# Altium PCB iMX6 Rex_V1I1_PCB.PcbDoc (part 5 of 8)
Units mm, origin at the board's own origin, x right, y up, seen from the top; angles counter-clockwise.
Board outline 70 x 40 mm, 12 copper layers (L1, L2, L3, L4, L5 (PWR), L6 (PWR), L7 (PWR), L8 (PWR), L9, L10, L11, L12), stack 1.566 mm thick; 473 components, 409 nets, 2294 pads, 1880 vias.
Unrouted connection lines stored in the file: 7.
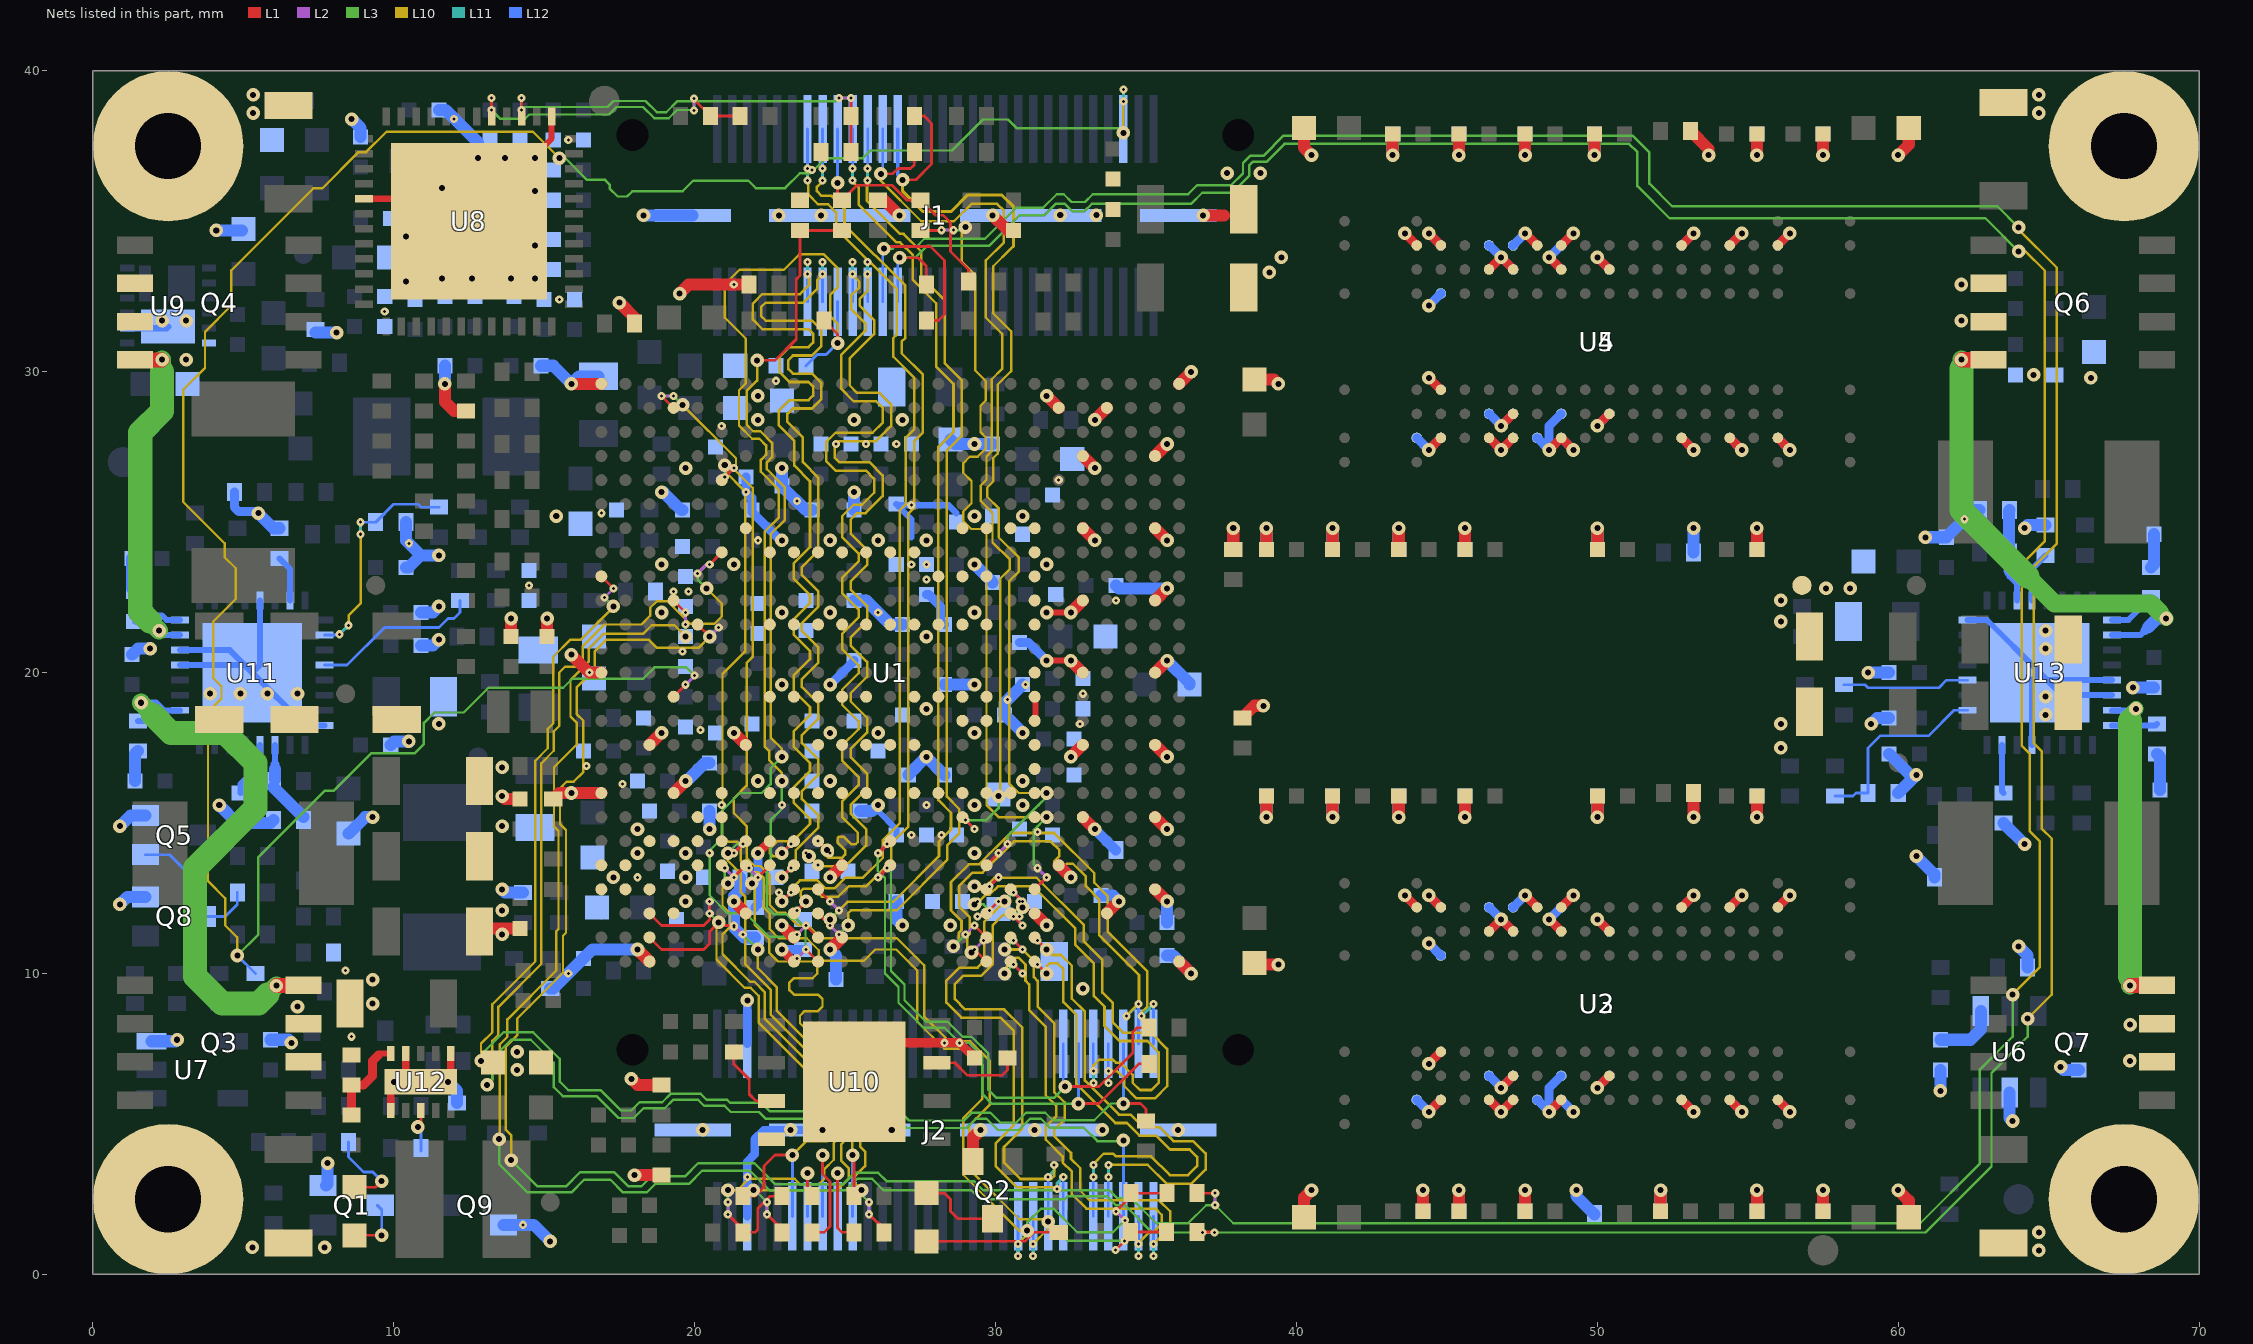
[diagram p15: the nets of this part, all layers, seen from the top]

## Via types
v1: diameter 0.45, hole 0.2, L1 to L12, tented both sides, 761 vias
v2: diameter 0.27, hole 0.1, L1 to L2, 305 vias
v3: diameter 0.27, hole 0.1, L2 to L3, 290 vias
v4: diameter 0.45, hole 0.2, L3 to L10, 196 vias
v5: diameter 0.27, hole 0.1, L11 to L12, 185 vias
v6: diameter 0.27, hole 0.1, L10 to L11, 142 vias
v7: diameter 0.45, hole 0.2, L3 to L10, tented both sides, 1 vias

## Nets (pads, with @x,y where several pads share a name; then routed paths per layer and width w, separated by ;. In a path a pad name is that pad's centre, name@x,y a point inside that pad or via, vN(x,y) a via of type N, cw(c..) or ccw(c..) an arc to the next point about the centre after c; other vN are vias at no path point) (continued)
FB1_2V5: R147.1 R150.2 U13.11 | length 3.1
  L12 w0.2: 63.7,23.3 63.7,23.2 63.95,22.95 U13.11@63.95,22.4
  L12 w0.3: 63.7,23.3 63.7,23.4
  L12 w0.4: 63.7,23.4 R147.1@63.7,24 63.675,24.025 63.675,25.375 R150.2@63.7,25.4
FB1_3V3: R123.1 R126.2 U11.11 | length 2.6
  L12 w0.2: 6.05,16.95 U11.11@6.05,17.6
  L12 w0.3: 6.05,16.8 6.05,16.95
  L12 w0.4: R123.1@6,16.2 R126.2@7,15.2 ; R123.1@6.05,16.45 6.05,16.8
FB_3V0_SNVS: R138.1 R139.2 U12.5 | length 3
  L1 w0.2: 9.5,7.3 9.55,7.35 U12.5@9.9,7.35
  L1 w0.3: R138.1@8.6,5.3 R139.2@8.6,6.3 9,6.3 9.3,6.6 9.3,7.1 9.5,7.3
GND: C1.2 C2.2 C3.2 C4.2 C5.2 C6.2 C7.2 C8.2 C9.2 C10.2 C11.2 C12.2 C13.2 C14.2 C15.2 C16.2 C17.2 C19.2 C20.2 C21.2 C22.2 C23.2 C24.2 C25.2 C26.2 C27.2 C28.2 C29.2 C30.2 C31.2 C32.2 C33.2 C34.2 C35.2 C36.2 C37.2 C38.2 C39.2 C40.2 C41.2 C42.2 C43.2 C44.2 C45.2 C46.2 C47.2 C48.2 C49.2 C50.2 C51.2 C52.2 C53.2 C54.2 C55.2 C56.2 C57.2 C58.2 C59.2 C60.2 C61.2 C62.2 C64.2 C68.2 C73.2 C74.1 C75.2 C76.2 C77.2 C78.2 C79.2 C80.2 C81.2 C82.2 C83.2 C84.2 C85.2 C86.2 C87.2 C88.2 C89.2 C90.2 C91.2 C92.2 C93.2 C94.2 C95.2 C96.2 C97.2 C98.2 C99.2 C100.2 C101.2 C102.2 C103.2 C104.2 C105.2 C106.2 C107.2 C108.2 C109.2 C110.2 C111.2 C112.2 C113.2 C114.2 C115.2 C116.2 C117.2 C118.2 C119.2 C120.2 C121.2 C122.2 C123.2 C124.2 C125.2 C126.2 C127.2 C128.2 C129.2 C130.2 C131.2 C132.2 C133.2 C134.2 C135.2 C136.2 C137.2 C138.2 C139.1 C140.2 C141.2 C142.2 C143.2 C144.2 C145.2 C146.2 C147.2 C148.2 C149.2 C150.2 C151.2 C152.2 C153.2 C154.2 C155.2 C156.2 C157.2 C158.2 C159.2 C160.2 C161.2 C162.2 C163.2 C164.2 C165.2 C166.2 C167.2 C168.2 C169.2 C170.2 C171.2 C172.2 C173.2 C174.2 C175.2 C176.2 C177.2 C178.2 C180.2 C181.2 C182.2 C183.2 C184.2 C185.2 C186.2 C187.2 C188.2 C189.2 C190.2 C191.2 C192.2 C193.2 C194.2 C195.2 C196.2 C197.2 C198.2 C199.2 C200.2 C201.2 C202.2 C203.2 C204.2 C205.2 C206.2 C207.2 C208.2 C209.2 C210.2 C213.2 C214.2 C215.2 C216.2 C217.2 C218.2 C219.2 C220.2 C221.2 C222.2 C223.2 C224.2 C225.2 C226.2 C227.2 C228.2 C229.2 C232.2 C233.2 C234.2 C235.2 C236.2 C237.2 C238.2 C239.2 C240.2 C241.2 C242.2 C243.2 C244.2 C245.2 C246.2 C247.2 C248.2 C249.2 J1.61 J1.62 J1.63 J1.64 J2.55 J2.56 J2.61 J2.62 J2.63 J2.64 MH1.1 MH2.1 MH3.1 MH4.1 Q1.2 Q2.2 Q3.2 Q3.3 Q4.2 Q4.3 Q5.2 Q6.2 Q6.3 Q7.2 Q7.3 Q8.2 Q9.2 R4.1 R5.1 R6.1 R7.1 R8.1 R9.1 R10.2 R12.1 R15.1 R16.1 R17.1 R20.1 R26.1 R30.1 R37.2 R56.1 R57.1 R58.1 R61.1 R67.1 R79.1 R84.2 R99.1 R101.1 R102.1 R124.2 R125.1 R126.1 R133.1 R136.1 R139.1 R143.1 R144.1 R148.2 R149.1 R150.1 R155.1 R158.1 TP10.1 U1.A4 U1.A5 U1.A8 U1.A13 U1.A25 U1.AA7 U1.AA10 U1.AA13 U1.AA16 U1.AA19 U1.AA22 U1.AB3 U1.AB24 U1.AD4 U1.AD7 U1.AD10 U1.AD13 U1.AD16 U1.AD19 U1.AD22 U1.AE1 U1.AE25 U1.B4 U1.B5 U1.C1 U1.C4 U1.C6 U1.C10 U1.D3 U1.D6 U1.D8 U1.E5 U1.E6 U1.E7 U1.F5 U1.F6 U1.F7 U1.F8 U1.G3 U1.G10 U1.G19 U1.H8 U1.H12 U1.H15 U1.H18 U1.J2 U1.J8 U1.J12 U1.J15 U1.J18 U1.K8 U1.K10 U1.K12 U1.K15 U1.K18 U1.L2 U1.L5 U1.L8 U1.L10 U1.L12 U1.L15 U1.L18 U1.M8 U1.M10 U1.M12 U1.M15 U1.M18 U1.N8 U1.N10 U1.N15 U1.N18 U1.P8 U1.P10 U1.P12 U1.P15 U1.P18 U1.R8 U1.R12 U1.R15 U1.R17 U1.T8 U1.T11 U1.T12 U1.T15 U1.T17 U1.T19 U1.U8 U1.U11 U1.U12 U1.U15 U1.U17 U1.U19 U1.V8 U1.V19 U1.W3 U1.W7 U1.W8 U1.W9 U1.W10 U1.W11 U1.W12 U1.W13 U1.W15 U1.W16 U1.W17 U1.W18 U1.W19 U1.Y5 U1.Y24 U2.A9 U2.B1 U2.B3 U2.B9 U2.D1 U2.D8 U2.E1 U2.E2 U2.E8 U2.F9 U2.G1 U2.G8 U2.G9 U2.J2 U2.J8 U2.M1 U2.M9 U2.P1 U2.P9 U2.T1 U2.T9 U3.A9 U3.B1 U3.B3 U3.B9 U3.D1 U3.D8 U3.E1 U3.E2 U3.E8 U3.F9 U3.G1 U3.G8 U3.G9 U3.J2 U3.J8 U3.M1 U3.M9 U3.P1 U3.P9 U3.T1 U3.T9 U4.A9 U4.B1 U4.B3 U4.B9 U4.D1 U4.D8 U4.E1 U4.E2 U4.E8 U4.F9 U4.G1 U4.G8 U4.G9 U4.J2 U4.J8 U4.M1 U4.M9 U4.P1 U4.P9 U4.T1 U4.T9 U5.A9 U5.B1 U5.B3 U5.B9 U5.D1 U5.D8 U5.E1 U5.E2 U5.E8 U5.F9 U5.G1 U5.G8 U5.G9 U5.J2 U5.J8 U5.M1 U5.M9 U5.P1 U5.P9 U5.T1 U5.T9 U6.2 U7.3 U8.13 U8.29 U8.49 U9.2 U9.12 U9.13 U10.4 U10.9 U11.8 U11.21 U11.22 U11.29 U11.33 U12.1 U12.4 U12.6 U12.11 U13.8 U13.21 U13.22 U13.29 U13.33 | length 250
  L1 w0.2: U8.29@9.01,35.75 U8.49@10.2,35.75 ; U8.49@14.65,37.15 15.25,37.75 U8.13@15.25,38.49 ; U1.W11@31.3,18.4 31.325,18.425 31.325,19.175 U1.W12@31.3,19.2 ; v1(31.7,20.4) v1(32.5,20.4) ; v1(31.7,22) v1(32.5,22)
  L1 w0.25: U12.6@9.9,5.35 9.9,6.3 v1(10,6.4) ; U12.11@10.4,6.2 U12.4@10.4,7.25 ; U12.11@11.9,6.4 U12.1@11.9,7.25
  L1 w0.3: U10.9@25.3,6.4 26.6,7.7 v2(28.8,7.7) C203.2@29.3,7.2 ; v1(43.6,12.6) U2.A9@44,12.2 ; v1(43.6,34.6) U4.A9@44,34.2 ; v1(44.4,5.4) U2.B1@44.8,5.8 ; v1(44.4,7) U2.B3@44.8,7.4 ; v1(44.4,12.6) U2.B9@44.8,12.2 ; v1(44.4,27.4) U4.B1@44.8,27.8 ; v1(44.4,29.8) U4.B3@44.8,29.4 ; v1(44.4,34.6) U4.B9@44.8,34.2 ; U2.D1@46.4,5.8 v1(46.8,5.4) U2.E1@47.2,5.8 ; U2.D8@46.4,11.4 v1(46.8,11.8) U2.E8@47.2,11.4 ; U4.D1@46.4,27.8 v1(46.8,27.4) U4.E1@47.2,27.8 ; U4.D8@46.4,33.4 v1(46.8,33.8) U4.E8@47.2,33.4 ; v1(46.8,6.2) U2.E2@47.2,6.6 ; v1(46.8,28.2) U4.E2@47.2,28.6 ; v1(47.6,12.6) U2.F9@48,12.2 ; v1(47.6,34.6) U4.F9@48,34.2 ; v1(48.4,5.4) U2.G1@48.8,5.8 ; v1(48.4,11.8) U2.G8@48.8,11.4 ; v1(48.4,27.4) U4.G1@48.8,27.8 ; v1(48.4,33.8) U4.G8@48.8,33.4 ; U2.G9@48.8,12.2 v1(49.2,12.6) ; U4.G1@48.8,27.8 v1(49.2,27.4) ; U4.G9@48.8,34.2 v1(49.2,34.6) ; v1(50,6.2) U2.J2@50.4,6.6 ; v1(50,11.8) U2.J8@50.4,11.4 ; v1(50,28.2) U4.J2@50.4,28.6 ; v1(50,33.8) U4.J8@50.4,33.4 ; U2.M1@52.8,5.8 v1(53.2,5.4) ; U2.M9@52.8,12.2 v1(53.2,12.6) ; U4.M1@52.8,27.8 v1(53.2,27.4) ; U4.M9@52.8,34.2 v1(53.2,34.6) ; U2.P1@54.4,5.8 v1(54.8,5.4) ; U2.P9@54.4,12.2 v1(54.8,12.6) ; U4.P1@54.4,27.8 v1(54.8,27.4) ; U4.P9@54.4,34.2 v1(54.8,34.6) ; U2.T1@56,5.8 v1(56.4,5.4) ; U2.T9@56,12.2 v1(56.4,12.6) ; U4.T1@56,27.8 v1(56.4,27.4) ; U4.T9@56,34.2 v1(56.4,34.6)
  L1 w0.4: v1(11.7,29.6) 11.7,29 12,28.7 R99.1@12.4,28.7 ; C215.2@13.2,11.5 C84.2@14.2,11.5 ; v1(13.6,15.9) 13.7,15.8 C83.2@14.2,15.8 ; C86.2@13.9,21.2 v1(13.9,21.8) ; C85.2@15.1,21.2 v1(15.1,21.8) ; R37.2@15.3,15.8 15.5,16 v1(15.9,16) U1.A8@16.9,16 ; v1(15.9,20.6) v2(16.5,20) U1.A13@16.9,20 ; v1@15.9,29.6 U1.A25@16.9,29.6 ; v1(17.5,32.3) 18,31.8 R84.2@18,31.6 ; v1(17.9,6.5) 18.1,6.3 R16.1@18.9,6.3 ; v1(18,3.3) R17.1@18.9,3.3 ; v1(18.1,10.8) U1.C1@18.5,10.4 ; U1.C10@18.5,17.6 v1(18.9,18) ; U1.D8@19.3,16 v1(19.7,16.4) ; v1(19.5,32.6) 19.8,32.9 v2(21.3,32.9) R143.1@21.8,32.9 ; v1(21.3,12.4) U1.G3@21.7,12 ; v1(21.3,18) U1.G10@21.7,17.6 ; v1(22.9,11.6) U1.J2@23.3,11.2 ; v1(24.5,10.8) U1.L2@24.9,11.2 ; v1(24.5,13.2) U1.L5@24.9,13.6 ; R144.1@26.1,35.7 26.3,35.7 v1(26.8,35.2) ; Q2.2@29.25,3.75 29.25,4.55 v1(29.5,4.8) ; v1(29.9,35.2) 30.4,34.7 C242.2@30.6,34.7 ; U1.W3@31.3,12 v1(31.7,11.6) ; v1(31.7,29.2) U1.Y24@32.1,28.8 ; U1.Y5@32.1,13.6 v1(32.5,13.2) ; v1(32.5,17.2) U1.AA10@32.9,17.6 ; v1(32.5,20.4) U1.AA13@32.9,20 ; v1(32.5,22) U1.AA16@32.9,22.4 ; U1.AA7@32.9,15.2 v1(33.3,14.8) ; U1.AA19@32.9,24.8 v1(33.3,24.4) ; U1.AA22@32.9,27.2 v1(33.3,26.8) ; v1(33.3,28.4) U1.AB24@33.7,28.8 ; U1.AB3@33.7,12 v1(34.1,12.4) ; U1.AD4@35.3,12.8 v1(35.7,12.4) ; U1.AD7@35.3,15.2 v1(35.7,14.8) ; U1.AD10@35.3,17.6 v1(35.7,17.2) ; U1.AD13@35.3,20 v1(35.7,20.4) ; U1.AD16@35.3,22.4 v1(35.7,22.8) ; U1.AD19@35.3,24.8 v1(35.7,24.4) ; U1.AD22@35.3,27.2 v1(35.7,27.6) ; U1.AE1@36.1,10.4 v1(36.5,10) ; U1.AE25@36.1,29.6 v1(36.5,30) ; v1(36.9,35.2) 37.6,35.2 ; R10.2@37.9,24.1 v1(37.9,24.8) ; R6.1@38.2,18.5 38.6,18.9 v1@38.8,18.9 ; C12.2@38.6,10.35 38.65,10.3 v1(39.4,10.3) ; C17.2@38.6,29.75 39.25,29.75 v1(39.4,29.6) ; v1(39,15.2) C26.2@39,15.9 ; C39.2@39,24.1 v1(39,24.8) ; C14.2@40.25,1.9 40.25,2.55 v1(40.5,2.8) ; C15.2@40.25,38.1 40.25,37.45 v1(40.5,37.2) ; v1(41.2,15.2) C24.2@41.2,15.9 ; C40.2@41.2,24.1 v1(41.2,24.8) ; v1(43.2,37.2) C36.2@43.2,37.9 ; v1(43.4,15.2) C25.2@43.4,15.9 ; C31.2@43.4,24.1 v1(43.4,24.8) ; C27.2@44.2,2.1 v1(44.2,2.8) ; C28.2@45.4,2.1 v1(45.4,2.8) ; v1(45.4,37.2) C37.2@45.4,37.9 ; v1(45.6,15.2) C23.2@45.6,15.9 ; C33.2@45.6,24.1 v1(45.6,24.8) ; C29.2@47.6,2.1 v1(47.6,2.8) ; v1(47.6,37.2) C34.2@47.6,37.9 ; v1(49.9,37.2) C8.2@49.9,37.9 ; v1(50,15.2) C3.2@50,15.9 ; C9.2@50,24.1 v1(50,24.8) ; C4.2@52.1,2.1 v1(52.1,2.8) ; R8.1@53.1,38 53.7,37.4 v1(53.7,37.2) ; v1(53.2,15.2) R4.1@53.2,16 ; C30.2@55.3,2.1 v1(55.3,2.8) ; v1(55.3,15.2) C22.2@55.3,15.9 ; C32.2@55.3,24.1 v1(55.3,24.8) ; v1(55.3,37.2) C38.2@55.3,37.9 ; C21.2@57.5,2.1 v1(57.5,2.8) ; v1(57.5,37.2) C35.2@57.5,37.9 ; v1(60,2.8) 60.35,2.45 C13.2@60.35,1.9 ; v1(60,37.2) 60.35,37.55 C16.2@60.35,38.1
  L12 w0.2: U11.21@2.9,20.25 U11.33@5.05,20.25 ; U11.22@2.9,20.75 4.55,20.75 U11.33@5.05,20.25 ; U11.29@5.55,22.4 5.55,20.25 U11.33@5.3,20 ; U11.8@7.7,18.25 7.05,18.25 U11.33@5.3,20 ; v1(26.1,15.6) 26.1,15.401 26.7,14.801 C107.2@26.7,14.6 ; U13.8@62.3,21.75 62.95,21.75 U13.33@64.7,20 ; U13.29@64.45,17.6 64.45,19.75 U13.33@64.7,20 ; U13.22@67.1,19.25 65.45,19.25 U13.33@64.95,19.75 ; U13.21@67.1,19.75 U13.33@64.95,19.75 ; U11.33@5.05,20.25 U11.33@5.3,20 ; U13.33@64.7,20 U13.33@64.95,19.75
  L12 w0.22: U9.2@1.14,31.45 2.448,31.45 U9.13@2.5,31.501 ; C130.2@26.7,25.6 C130.2@26.735,25.565 ; 27.2,24.5 27.2,25.1 C130.2@26.735,25.565 ; 28.7,25.3 28.435,25.565 C130.2@26.735,25.565
  L12 w0.28: J2.55@21.75,1.93 21.75,3.75 21.994,3.994 21.994,4.494 22.3,4.8 J2.63@24.825,4.8 ; J2.56@21.75,7.67 v1(21.75,9.108)
  L12 w0.3: R136.1@4.7,26 4.7,25.5 4.85,25.35 5.45,25.35 v1(5.5,25.3) ; C125.2@21.7,26.5 v5(21.7,26) 21.9,25.8 C122.2@21.9,25.4 21.9,25.346 22.846,24.4 v1(22.9,24.4) ; v1(24.5,19.6) C94.2@25.3,20.4 ; C113.2@27.7,22.6 27.772,22.6 28.175,22.197 28.175,21.725 C97.2@28.3,21.6 ; C117.2@30.8,21 31.1,21 v1(31.7,20.4) ; U3.A9@44,5.8 v1(44.4,5.4) U3.B9@44.8,5.8 ; U5.A9@44,27.8 v1(44.4,27.4) U5.B9@44.8,27.8 ; v1(44.4,11) U3.B3@44.8,10.6 ; v1(44.4,12.6) U3.B1@44.8,12.2 ; v1(44.4,32.2) U5.B3@44.8,32.6 ; v1(44.4,34.6) U5.B1@44.8,34.2 ; U3.D8@46.4,6.6 v1(46.8,6.2) U3.E8@47.2,6.6 ; U3.D1@46.4,12.2 U3.E2@47.2,11.4 ; U5.D8@46.4,28.6 v1(46.8,28.2) U5.E8@47.2,28.6 ; U5.D1@46.4,34.2 v1(46.8,33.8) U5.E2@47.2,33.4 ; U3.E1@47.2,12.2 v1(47.6,12.6) ; U5.E1@47.2,34.2 v1(47.6,34.6) ; U3.F9@48,5.8 v1(48.4,5.4) 48.4,6.2 U3.G8@48.8,6.6 ; U5.F9@48,27.8 v1(48.4,27.4) 48.4,28.2 U5.G8@48.8,28.6 ; v1(48.4,11.8) U3.G1@48.8,12.2 ; v1(48.4,33.8) U5.G1@48.8,34.2 ; U3.G9@48.8,5.8 v1(49.2,5.4) ; U5.G9@48.8,27.8 v1(49.2,27.4) ; v1(50,6.2) U3.J8@50.4,6.6 ; v1(50,11.8) U3.J2@50.4,11.4 ; v1(50,28.2) U5.J8@50.4,28.6 ; v1(50,33.8) U5.J2@50.4,33.4 ; U3.M9@52.8,5.8 v1(53.2,5.4) ; U3.M1@52.8,12.2 v1(53.2,12.6) ; U5.M9@52.8,27.8 v1(53.2,27.4) ; U5.M1@52.8,34.2 v1(53.2,34.6) ; U3.P9@54.4,5.8 v1(54.8,5.4) ; U3.P1@54.4,12.2 v1(54.8,12.6) ; U5.P9@54.4,27.8 v1(54.8,27.4) ; U5.P1@54.4,34.2 v1(54.8,34.6) ; U3.T9@56,5.8 v1(56.4,5.4) ; U3.T1@56,12.2 v1(56.4,12.6) ; U5.T9@56,27.8 v1(56.4,27.4) ; U5.T1@56,34.2 v1(56.4,34.6)
  L12 w0.35: v1(33.3,14.8) R7.1@34,14.1
  L12 w0.4: v1(0.9,12.3) 1.15,12.55 Q8.2@1.75,12.55 ; v1(0.9,14.9) 1.25,15.25 Q5.2@1.75,15.25 ; C206.2@1.3,20.6 1.5,20.8 v1(1.9,20.8) ; U7.3@1.95,7.75 2.75,7.75 v1(2.8,7.8) ; v1(4.1,34.7) C178.2@4.95,34.7 ; v1(4.2,15.6) R125.1@4.8,15 ; R125.1@4.9,15 5.9,15 R126.1@6,15.1 ; v1(5.5,25.3) 6,24.8 R124.2@6.2,24.8 ; C89.2@5.9,7.8 6.5,7.8 v1(6.6,7.7) ; R101.1@7.4,31.3 v1(8.1,31.3) ; Q1.2@7.75,2.95 7.8,3 v1(7.8,3.7) ; C204.2@8.5,14.65 9.05,15.2 v1(9.3,15.2) ; v1(8.6,38.4) 8.9,38.1 C184.2@8.9,37.8 ; C205.2@9.9,17.6 10.014,17.714 v1(10.5,17.714) ; C219.2@10.4,23.5 10.5,23.5 10.9,23.9 ; R133.1@10.4,25 10.4,24.4 10.9,23.9 ; C218.2@10.9,20.9 11.3,20.9 v1(11.5,21.1) ; C207.2@10.9,22 11.3,22 v1(11.5,22.2) ; v1(11.5,23.9) 10.9,23.9 ; C249.2@11.5,38.7 11.727,38.7 12.8,37.627 v1(12.8,37.1) ; v1(11.6,36.1) C186.2@12.3,35.4 ; v1(11.7,29.6) C176.2@11.7,30.2 ; v1(11.8,6.4) 12.1,6.1 R58.1@12.1,5.7 ; C186.2@12.35,35.4 C186.2@12.45,35.4 ; v1(13.6,12.8) 13.7,12.7 R79.1@14.3,12.7 ; Q9.2@13.65,1.65 14.65,1.65 v1(15.2,1.1) ; C175.2@14.9,30.2 15.3,30.2 v1(15.9,29.6) 16.15,29.85 C148.2@16.8,29.85 ; R15.1@15.2,9.5 15.3,9.5 C244.2@16.3,10.5 16.6,10.8 v1(18.1,10.8) ; v1(18.3,35.2) J1.64@19.935,35.2 ; v1(18.9,26) 18.958,26 19.558,25.4 C152.2@19.6,25.4 ; v1(19.7,16.4) 19.735,16.4 20.335,17 C139.1@20.5,17 ; v1(20.5,14.8) C143.2@20.5,15.4 ; C61.2@21.5,13.2 21.5,12.774 21.3,12.574 v1(21.3,12.4) v5(21.3,11.542) 21.642,11.2 R61.1@22,11.2 ; v1(22.9,26.8) C131.2@22.9,26.2 23.7,25.4 C134.2@23.9,25.4 ; v1(24.5,10.8) 24.7,10.6 C1.2@24.7,9.8 ; C124.2@25.3,22.4 25.7,22.4 26.5,21.6 C95.2@26.9,21.6 ; C133.2@25.3,25.4 v1(25.3,26) ; C90.2@25.5,15.4 25.9,15.4 v1(26.1,15.6) ; C76.2@26.7,12.4 26.7,11.8 v1(26.9,11.6) ; C116.2@27.1,16.6 v1(27.7,17.2) C115.2@28.3,16.6 ; C105.2@28.3,19.6 v1(29.3,19.6) ; C129.2@28.5,27.75 28.65,27.6 v1(29.3,27.6) C160.2@29.9,27.6 ; v1(29.3,23.6) C114.2@29.9,23 ; v1(30.9,18) C102.2@30.3,18.6 30.3,19 C112.2@30.9,19.6 ; C243.2@33.5,12.6 33.9,12.6 v1(34.1,12.4) ; C171.2@34,22.9 34.1,22.8 v1(35.7,22.8) ; C245.2@35.7,10.6 35.9,10.6 v1(36.5,10) ; C7.2@35.7,11.7 v1(35.7,12.4) ; v1(35.7,20.4) 36.45,19.65 C172.2@36.45,19.6 ; v1(39,15.2) C46.2@39,15.9 ; C60.2@39,24.1 v1(39,24.8) ; v1(41.2,15.2) C43.2@41.2,15.9 ; C51.2@41.2,24.1 v1(41.2,24.8) ; v1(43.2,37.2) C57.2@43.2,37.9 ; v1(43.4,15.2) C45.2@43.4,15.9 ; C53.2@43.4,24.1 v1(43.4,24.8) ; C47.2@44.2,2.1 v1(44.2,2.8) ; C49.2@45.4,2.1 v1(45.4,2.8) ; v1(45.4,37.2) C56.2@45.4,37.9 ; v1(45.6,15.2) C44.2@45.6,15.9 ; C52.2@45.6,24.1 v1(45.6,24.8) ; C48.2@47.6,2.1 v1(47.6,2.8) ; v1(47.6,37.2) C59.2@47.6,37.9 ; v1(49.3,2.8) 49.3,2.6 R5.1@49.9,2 ; v1(49.9,37.2) C10.2@49.9,37.9 ; v1(50,15.2) C5.2@50,15.9 ; C11.2@50,24.1 v1(50,24.8) ; C6.2@52.1,2.1 v1(52.1,2.8) ; R9.1@53.2,24 v1(53.2,24.8) ; C50.2@55.3,2.1 v1(55.3,2.8) ; v1(55.3,15.2) C42.2@55.3,15.9 ; C54.2@55.3,24.1 v1(55.3,24.8) ; v1(55.3,37.2) C58.2@55.3,37.9 ; C41.2@57.5,2.1 v1(57.5,2.8) ; v1(57.5,37.2) C55.2@57.5,37.9 ; v1(59,20) C237.2@59.7,20 ; v1(59.1,18.3) 59.3,18.5 C226.2@59.7,18.5 ; C238.2@59.7,17.3 60.4,16.6 v1(60.6,16.6) R155.1@60,16 ; v1(60.6,13.9) 61.2,13.3 R158.1@61.2,13.2 ; v1(60.9,24.5) C224.2@61.6,24.5 62.5,25.4 R150.1@62.7,25.4 ; v1(61.4,6.1) C88.2@61.4,6.8 ; R148.2@63.5,15 v1(64.2,14.3) ; U6.2@63.7,6.05 63.7,5.2 v1(63.8,5.1) ; v1(64,10.9) 64.3,10.6 R67.1@64.3,10.2 ; v1(64.2,24.8) 64.3,24.9 R149.1@64.9,24.9 ; v1(65.4,6.9) 65.5,6.8 C87.2@66,6.8 ; v1(67.8,19.5) C225.2@68.5,19.5
  other v1: 64.675,0.8 5.3,0.9 7.7,0.9 64.675,1.4 20.263,4.805 23.187,4.805 24.25,4.805 26.55,4.805 31.3,4.8 33.55,4.805 36.065,4.8 14.1,6.8 67.7,7.1 14.1,7.4 67.705,8.3 6.8,8.9 9.3,9 32.9,9.5 9.3,9.8 13.6,11.3 28.5,11.6 13.6,12.1 19.7,12.4 17.3,13.2 19.7,13.2 18.1,14 19.7,14 29.3,14 18.1,14.8 13.6,14.9 29.3,15.6 30.9,15.6 22.1,16.4 24.5,16.4 30.9,16.4 13.6,16.85 56.1,17.5 24.5,18 26.1,18 29.3,18 11.5,18.3 56.1,18.3 64.9,18.6 27.7,18.8 38.9,18.9 64.9,19.2 3.9,19.3 4.9,19.3 5.8,19.3 6.8,19.3 22.9,19.6 64.9,20.8 27.7,21.2 64.9,21.4 56.1,21.7 18.9,22 22.9,22 24.5,22 29.3,22 56.1,22.4 57.6,22.8 58.4,22.8 18.9,23.6 21.3,23.6 31.7,23.6 24.5,24.4 26.1,24.4 27.7,24.4 15.4,25.2 29.3,25.2 30.9,25.2 19.7,26.8 22.1,28.4 25.3,28.4 26.9,28.4 22.1,29.2 66.4,29.8 64.5,29.9 3.1,30.4 2.3,31.7 3.1,31.7 62.1,31.7 62.1,32.9 10.4,33 11.6,33.1 12.6,33.1 13.9,33.1 14.7,33.1 39.1,33.3 39.5,33.8 14.7,34.2 10.4,34.5 22.8,35.2 24.2,35.2 32.15,35.205 33.35,35.205 14.7,36 37.7,36.6 38.8,36.6 13.7,37.1 14.7,37.1 5.325,38.6 64.675,38.6 5.325,39.2 64.675,39.2
  other v2: 28.3,7.7 8.6,7.9 18.1,13.2 20.5,14 20.9,15.6 22.9,15.6 27.7,15.6 31,19.6 26.1,22 27.7,23.6 22.1,24.4 23.9,36.7
  other v5: 14.3,1.65 21.75,3.243 15.8,10 8.4,10.1 29.4,11.9 30.8,11.9 29.4,12.4 30.8,12.4 22.8,12.7 27.2,14.6 28.2,14.6 31.4,14.7 17.6,16.3 16.4,16.9 20.2,18.1 32.8,18.3 30.4,19.1 32.9,19.3 19.6,20.7 26.1,22 34,22.4 19.3,22.7 19.8,22.7 14.5,22.9 27.7,23.1 27.2,23.6 10.5,24.3 62.2,25.1 16.9,25.3 27.2,25.565 23.4,25.7 32.1,26.4 24.7,27.6 25.7,27.6 26.7,27.6 20.9,28.2 22.7,29.7 9.7,32 15.5,32.4 15.8,37.7 12,38.4
HDMI_CEC: R25.1 U1.W4 | length 27.5
  L1 w0.093: R25.1@27.6,34.7 28.195,34.7 v2(28.2,34.705) ; U1.W4@31.3,12.8 v2(31.7,13.2)
  L2 w0.1: v2(28.2,34.705) v3(28.6,34.705) ; v3(31.4,13.5) v2(31.7,13.2)
  L3 w0.08: v3(28.6,34.705) 28.9,34.705 v4(29,34.805) ; v3(31.4,13.5) 31.275,13.625 31.275,14.775 v4(31.7,15.2)
  L10 w0.08: v4(29,34.805) 28.875,34.68 28.875,33.665 29.325,33.215 29.325,30.045 29.675,29.695 29.675,29.045 29.5,28.87 29.5,28 29.675,27.825 29.675,27.445 29.405,27.175 29.145,27.175 28.925,26.955 28.925,26.645 29.2,26.37 29.2,25.63 28.925,25.355 28.925,25.045 29.195,24.775 29.525,24.775 29.7,24.6 29.7,15.6 30.1,15.2 v4(31.7,15.2)
HDMI_CEC_IN: J1.44 R22.1 R24.2 R25.2 | length 9
  L1 w0.093: v1(24.75,36.28) 24.75,35.85 R24.2@24.9,35.7 25.4,36.2 26.562,36.2 27.062,35.7 R25.2@27.5,35.7 27.995,35.205 28.25,35.205 28.5,34.955 28.5,34 29.1,33.4 R22.1@29.1,33
  L12 w0.093: v1(24.75,36.28) J1.44@24.75,38.07
HDMI_CLK_N: J1.45 U1.J5 | length 32.2
  L1 w0.09: v2(22.9,13.2) U1.J5@23.3,13.6
  L2 w0.1: v2(22.9,13.2) v3(23.2,13.5)
  L3 w0.085: v2(22.9,13.2) v3(23.2,13.5)
  L10 w0.085: v2(22.9,13.2) 23.363,13.663 23.363,14.103 24.114,14.854 24.114,15.252 23.566,15.8 23.566,16.066 24.114,16.614 24.114,17.112 23.566,17.66 23.566,17.926 24.114,18.474 24.114,18.972 23.566,19.52 23.566,19.786 24.114,20.334 24.114,20.832 23.566,21.38 23.566,21.646 24.114,22.194 24.114,22.692 23.566,23.24 23.566,23.506 24.114,24.054 24.114,26.476 23.595,26.995 23.595,27.817 23.08,28.332 23.08,28.598 23.262,28.78 23.9,28.78 24.214,29.094 24.214,29.626 23.9,29.94 23.262,29.94 23.112,30.09 23.112,30.39 23.262,30.54 23.9,30.54 24.214,30.854 24.214,31.386 23.9,31.7 22.362,31.7 22.212,31.85 22.212,32.15 22.362,32.3 23.616,32.3 24.08,32.764 24.08,33.046 24.25,33.216 v6(24.25,33.242)
  L11 w0.1: v6(24.25,33.242) v5(24.25,33.642)
  L12 w0.09: J1.45@24.25,32.33 v5(24.25,33.642)
  other v4: 22.9,13.2
HDMI_CLK_P: J1.47 U1.J6 | length 32.2
  L1 w0.09: v4(22.9,14) U1.J6@23.3,14.4
  L2 w0.1: v4(22.9,14) v3(23.2,14.3)
  L3 w0.085: v4(22.9,14) v3(23.2,14.3)
  L10 w0.085: v4(22.9,14) 22.8,13.9 22.6,13.9 22.5,14 22.5,14.15 22.75,14.4 23.264,14.4 23.834,14.97 23.834,15.136 23.286,15.684 23.286,16.182 23.834,16.73 23.834,16.996 23.286,17.544 23.286,18.042 23.834,18.59 23.834,18.856 23.286,19.404 23.286,19.902 23.834,20.45 23.834,20.716 23.286,21.264 23.286,21.762 23.834,22.31 23.834,22.576 23.286,23.124 23.286,23.622 23.834,24.17 23.834,26.36 23.315,26.879 23.315,27.701 22.8,28.216 22.8,28.714 23.146,29.06 23.784,29.06 23.934,29.21 23.934,29.51 23.784,29.66 23.146,29.66 22.832,29.974 22.832,30.506 23.146,30.82 23.784,30.82 23.934,30.97 23.934,31.27 23.784,31.42 22.246,31.42 21.932,31.734 21.932,32.266 22.246,32.58 23.5,32.58 23.8,32.88 23.8,33.192 v6(23.75,33.242)
  L11 w0.1: v6(23.75,33.242) v5(23.75,33.642)
  L12 w0.09: J1.47@23.75,32.33 v5(23.75,33.642)
  other v2: 22.9,14
HDMI_D0_N: J1.39 U1.K5 | length 32.1
  L1 w0.09: v2(23.7,14) v3(24.1,13.6)
  L2 w0.1: v2(23.7,14) v3(24.1,13.6)
  L3 w0.085: v4(23.8,13.9) v3(24.1,13.6)
  L10 w0.085: v4(23.8,13.9) 24.132,13.568 25.013,13.568 25.7,14.254 25.7,14.8 25.182,15.318 25.182,15.596 25.73,16.144 25.73,16.642 25.182,17.19 25.182,17.456 25.73,18.004 25.73,18.502 25.182,19.05 25.182,19.316 25.73,19.864 25.73,20.362 25.182,20.91 25.182,21.176 25.73,21.724 25.73,22.222 25.182,22.77 25.182,23.036 25.73,23.584 25.73,24.082 25.182,24.63 25.182,25.082 25.4,25.3 25.68,25.3 26.244,25.864 26.244,26.556 25.806,26.994 24.802,26.994 24.652,27.144 24.652,27.544 24.802,27.694 26.03,27.694 26.532,28.197 26.532,28.916 26.148,29.3 25.4,29.3 25.148,29.552 25.148,30.437 25.964,31.254 25.964,31.716 25.48,32.2 25.48,32.414 25.75,32.684 v6(25.75,33.242)
  L11 w0.1: v6(25.75,33.242) v5(25.75,33.642)
  L12 w0.09: J1.39@25.75,32.33 v5(25.75,33.642)
HDMI_D0_P: J1.41 U1.K6 | length 32.1
  L1 w0.09: v3(24.1,14.4) v2(24.5,14)
  L2 w0.1: v3(24.1,14.4) v2(24.5,14)
  L3 w0.085: v3(24.1,14.4) v4(24.4,14.1)
  L10 w0.085: v4(24.4,14.1) 24.4,13.898 24.45,13.848 24.897,13.848 25,13.95 25,14.1 24.75,14.35 24.75,14.5 24.8,14.55 24.95,14.55 25.2,14.3 25.35,14.3 25.42,14.37 25.42,14.684 24.902,15.202 24.902,15.712 25.45,16.26 25.45,16.526 24.902,17.074 24.902,17.572 25.45,18.12 25.45,18.386 24.902,18.934 24.902,19.432 25.45,19.98 25.45,20.246 24.902,20.794 24.902,21.292 25.45,21.84 25.45,22.106 24.902,22.654 24.902,23.152 25.45,23.7 25.45,23.966 24.902,24.514 24.902,25.198 25.284,25.58 25.564,25.58 25.964,25.98 25.964,26.44 25.69,26.714 24.686,26.714 24.372,27.028 24.372,27.66 24.686,27.974 25.914,27.974 26.252,28.312 26.252,28.8 26.032,29.02 25.284,29.02 24.868,29.437 24.868,30.553 25.684,31.37 25.684,31.6 25.2,32.084 25.2,32.53 25.47,32.8 25.47,32.996 25.25,33.216 v6(25.25,33.242)
  L11 w0.1: v6(25.25,33.242) v5(25.25,33.642)
  L12 w0.09: J1.41@25.25,32.33 v5(25.25,33.642)
HDMI_D1_N: J1.46 U1.J3 | length 32.1
  L1 w0.09: U1.J3@23.3,12 v4(23.7,12.4)
  L2 w0.1: v3(23.4,12.1) v4(23.7,12.4)
  L3 w0.085: v3(23.4,12.1) v4(23.7,12.4)
  L10 w0.085: v4(23.7,12.4) 23.523,12.577 23.523,12.727 23.616,12.82 23.964,12.82 24.232,12.552 24.768,12.552 25.116,12.9 25.7,12.9 26.532,13.732 26.532,14.317 27.1,14.884 27.1,25.284 27.3,25.484 27.3,27.704 27.582,27.986 27.582,29.914 26.88,30.616 26.88,31 27,31.12 27,32.86 24.98,34.88 24.98,35.416 24.548,35.848 24.216,35.848 24.06,36.004 24.06,36.14 24.25,36.331 v6(24.25,36.357)
  L11 w0.1: v6(24.25,36.357) v5(24.25,36.758)
  L12 w0.09: v5(24.25,36.758) J1.46@24.25,38.07
  other v2: 23.7,12.4
HDMI_D1_P: J1.48 U1.J4 | length 32.1
  L1 w0.09: v2(22.9,12.4) U1.J4@23.3,12.8
  L2 w0.1: v2(22.9,12.4) v3(23.2,12.7)
  L3 w0.085: v2(22.9,12.4) v3(23.2,12.7)
  L10 w0.085: v2(22.9,12.4) 23.243,12.743 23.243,12.843 23.5,13.1 24.08,13.1 24.348,12.832 24.652,12.832 25,13.18 ; v6(23.75,36.357) 23.78,36.328 23.78,35.888 24.1,35.568 24.432,35.568 24.7,35.3 24.7,34.764 26.72,32.744 26.72,31.236 26.6,31.116 26.6,30.5 27.302,29.798 27.302,28.102 27.02,27.82 27.02,25.6 26.82,25.4 26.82,15 26.252,14.433 26.252,13.848 25.584,13.18 25,13.18
  L11 w0.1: v6(23.75,36.357) v5(23.75,36.758)
  L12 w0.09: v5(23.75,36.758) J1.48@23.75,38.07
  other v4: 22.9,12.4
HDMI_D2_N: J1.40 U1.K3 | length 32.1
  L1 w0.09: U1.K3@24.1,12 v2(24.5,11.6)
  L2 w0.1: v2(24.5,11.6) v3(24.8,11.3)
  L3 w0.085: v3(24.8,11.3) v4(25.1,11.6)
  L10 w0.085: v4(25.1,11.6) 25.1,12.004 25.196,12.1 26.716,12.1 28.4,13.784 28.4,14.266 28.8,14.666 28.8,15.46 28.38,15.88 28.38,27.384 28.882,27.886 28.882,29.714 28.308,30.288 28.308,32.392 27.53,33.17 27.53,33.991 26.941,34.58 26.825,34.58 25.728,35.677 25.728,36.335 v6(25.75,36.357)
  L11 w0.1: v6(25.75,36.357) v5(25.75,36.758)
  L12 w0.09: v5(25.75,36.758) J1.40@25.75,38.07
HDMI_D2_P: J1.42 U1.K4 | length 32.1
  L1 w0.09: U1.K4@24.1,12.8 v2(24.5,12.4)
  L2 w0.1: v2(24.5,12.4) v3(24.8,12.1)
  L3 w0.085: v4(24.5,11.8) v3(24.8,12.1)
  L10 w0.085: v4(24.5,11.8) 25.08,12.38 26.6,12.38 28.12,13.9 28.12,14.382 28.52,14.782 28.52,15.344 28.1,15.764 28.1,27.5 28.602,28.002 28.602,29.598 28.028,30.172 28.028,32.277 27.25,33.054 27.25,33.875 26.825,34.3 26.709,34.3 25.448,35.561 25.448,36.133 25.25,36.331 v6(25.25,36.357)
  L11 w0.1: v6(25.25,36.357) v5(25.25,36.758)
  L12 w0.09: v5(25.25,36.758) J1.42@25.25,38.07
HDMI_DDC: R24.1 R26.2 U1.K2 | length 31.7
  L1 w0.093: v1(22.075,30.38) 22.675,30.38 23.375,31.08 23.375,33.075 23.5,33.2 R26.2@23.5,34.7 R24.1@24.9,34.7 ; v2(23.7,11.6) U1.K2@24.1,11.2
  L2 w0.1: v3(23.4,11.3) v2(23.7,11.6)
  L3 w0.08: v4(22.9,17.2) 22.525,16.825 22.525,16.295 22.23,16 21.5,16 20.9,15.4 20.9,14.485 20.5,14.085 20.5,12.6 21.1,12 21.7,12 22.475,11.225 23.325,11.225 v3(23.4,11.3)
  L10 w0.08: v1(22.075,30.38) 22.075,29.705 21.725,29.355 21.725,28.245 21.945,28.025 22.188,28.025 22.575,27.638 22.575,27.162 22.4,26.987 22.4,26.758 23,26.158 23,25.075 22.525,24.6 22.525,17.845 22.9,17.47 v4(22.9,17.2)
HDMI_HPD: C74.2 J1.43 R21.1 U1.K1 | length 37
  L1 w0.093: v2(23.7,10.8) U1.K1@24.1,10.4 ; R21.1@24.3,31.7 24.75,31.25 v1(24.75,30.955)
  L2 w0.1: v3(23.4,10.5) v2(23.7,10.8)
  L3 w0.08: v4(22.9,16.4) 22.9,15.475 22.525,15.1 22.525,13.7 22.4,13.575 22.4,12.2 22.625,11.975 23.055,11.975 23.215,11.815 23.385,11.815 23.685,11.515 23.685,10.785 v3(23.4,10.5)
  L10 w0.08: v4(22.9,16.4) 22.9,16.67 22.475,17.095 22.475,17.4 22.325,17.55 22.325,24.683 22.8,25.158 22.8,26.075 22.2,26.675 22.2,27.07 22.375,27.245 22.375,27.555 22.155,27.775 21.912,27.775 21.475,28.212 21.475,29.388 21.7,29.613 21.7,31.1 21,31.8 21,32.9 21.492,33.392 22.968,33.392 23.475,33.9 24.3,33.9 24.75,33.45 24.75,32.8 24.5,32.55 24.5,31.85 24.75,31.6 v1(24.75,30.955)
  L12 w0.101: C74.2@23.7,30.2 24.076,30.576 24.371,30.576 v1(24.75,30.955) ; v1(24.75,30.955) J1.43@24.75,32.33
HDMI_RESREF: R30.2 U1.J1 | length 1.3
  L1 w0.3: v1(22.9,10.8) U1.J1@23.3,10.4
  L12 w0.3: v1(22.9,10.8) R30.2@23.6,10.8
I2C1_SCL: J2.14 R47.1 U1.N5 | length 18.6
  L1 w0.093: v2(26.1,13.2) U1.N5@26.5,13.6 ; v1(32.313,6.242) 33.438,6.242 34.563,7.367 34.563,8.055 34.707,8.2 R47.1@35.1,8.2
  L2 w0.1: v2(26.1,13.2) v3(26.4,13.5)
  L3 w0.08: v3(26.4,13.5) 26.525,13.375 26.525,10.088 26.975,9.638 26.975,9.113 27.688,8.4 28.4,8.4 28.9,7.9 29.2,7.9 29.763,7.337 29.763,6.137 30.032,5.867 31.938,5.867 v1(32.313,6.242)
  L12 w0.093: J2.14@32.25,7.67 32.25,6.305 v1(32.313,6.242)
I2C1_SDA: J2.12 R46.1 U1.N6 | length 19.7
  L1 w0.093: v2(26.1,14) U1.N6@26.5,14.4 ; v1(32.75,5.68) 33.438,5.68 34.758,7 R46.1@35.1,7
  L2 w0.1: v2(26.1,14) v3(26.4,14.3)
  L3 w0.08: v3(26.4,14.3) 26.085,13.985 26.085,13.412 26.325,13.172 26.325,10.005 26.775,9.555 26.775,9.03 27.605,8.2 28.3,8.2 28.8,7.7 29.117,7.7 29.563,7.255 29.563,5.993 29.888,5.667 32.737,5.667 v1(32.75,5.68)
  L12 w0.101: v1(32.75,5.68) J2.12@32.75,7.67
I2C2_SCL: J1.36 R28.1 U1.U5 | length 34.9
  L1 w0.093: v1(26.912,36.38) 27.35,36.38 27.875,36.905 27.875,38.255 27.63,38.5 R28.1@27.3,38.5 ; U1.U5@29.7,13.6 v2(30.1,14)
  L2 w0.1: v2(30.1,14) v3(30.4,14.3)
  L3 w0.08: v3(30.4,14.3) 30.4,14.57 31.43,15.6 31.7,15.87 v4(31.7,16)
  L10 w0.08: 30.5,34.08 29.925,33.505 29.925,31.938 30.517,31.346 30.517,30.017 30.075,29.575 30.075,27.279 29.925,27.129 29.925,26.355 29.725,26.155 29.725,25.845 30.1,25.47 30.1,24.5 30.775,23.825 30.775,23.362 30.45,23.037 30.45,16.32 30.77,16 v4(31.7,16)
  L10 w0.101: v1(26.912,36.38) 26.912,36.001 27.584,35.33 28.53,35.33 29.08,35.88 30.2,35.88 30.6,35.48 30.6,34.18 30.5,34.08
  L12 w0.101: J1.36@26.75,38.07 26.75,36.542 v1(26.912,36.38)
I2C2_SDA: J1.38 R29.1 U1.T7 | length 31.8
  L1 w0.093: v1(26.188,36.58) 26.58,36.58 26.755,36.755 27.175,36.755 27.3,36.88 R29.1@27.3,37.3 ; U1.T7@28.9,15.2 v2(29.3,14.8)
  L2 w0.1: v3(29,15.1) v2(29.3,14.8)
  L3 w0.08: v3(29,15.1) 29.7,15.1 30.1,15.5 v4(30.1,15.9)
  L10 w0.08: v1(26.188,36.58) 26.188,36.343 27.53,35 28.62,35 29.2,35.58 30.05,35.58 30.275,35.355 30.275,34.3 29.675,33.7 29.675,31.805 30.217,31.263 30.217,30.092 29.875,29.75 29.875,27.362 29.7,27.187 29.7,26.413 29.508,26.221 29.508,25.7 29.9,25.308 29.9,24.33 30.475,23.755 30.475,23.445 30.15,23.12 30.15,15.95 v4(30.1,15.9)
  L12 w0.093: v1(26.188,36.58) 26.25,36.642 J1.38@26.25,38.07
I2C3_SCL: J2.19 R31.1 R157.2 U1.F21 | length 44.4
  L1 w0.093: U1.F21@20.9,26.4 v2(21.3,26.8) ; v2(34,2.1) 34.5,2.6 R31.1@34.5,2.7 R157.2@35.7,2.7
  L2 w0.1: v3(21,26.5) v2(21.3,26.8) ; v2(34,2.1) v3(34.3,1.8)
  L3 w0.08: v3(21,26.5) v4(21,26.9) ; v4(31.05,1.458) 31.05,1.73 31.5,2.18 31.938,2.18 32.718,1.4 33.9,1.4 v3(34.3,1.8)
  L10 w0.08: v4(21,26.9) 21,26.7 21.675,26.025 21.675,20.7 20.925,19.95 20.925,14.575 21.125,14.375 21.425,14.375 21.525,14.275 21.525,13.762 21.912,13.375 22.1,13.375 22.3,13.175 22.3,12.187 22.493,11.993 22.493,11.476 22.795,11.175 23.725,11.175 24.125,10.775 24.125,10.6 24.3,10.425 25.625,10.425 26,10.8 26.7,10.8 27.4,10.1 27.4,8.4 28.3,7.5 29.022,7.5 29.563,6.96 29.563,5.838 28.925,5.2 28.925,3.313 30.78,1.458 v4(31.05,1.458) 31.05,1.318 v6(30.75,1.018)
  L11 w0.1: v5(30.75,0.617) v6(30.75,1.018)
  L12 w0.093: v5(30.75,0.617) J2.19@30.75,1.93
I2C3_SDA: J2.17 R32.1 R156.2 U1.D24 | length 45.4
  L1 w0.093: v2(18.9,29.2) U1.D24@19.3,28.8 ; v2(33.987,0.808) 34.487,1.308 R32.1@34.487,1.408 R156.2@35.687,1.408
  L2 w0.1: v2(18.9,29.2) v3(19.3,29.2) ; v2(33.987,0.808) v3(34.287,1.107)
  L3 w0.08: v3(19.3,29.2) v4(19.6,28.9) ; v4(31.75,1.758) 32.39,1.118 34.277,1.118 v3(34.287,1.107)
  L10 w0.08: v4(19.6,28.9) 21.375,27.125 21.375,26.695 21.925,26.145 21.925,20.525 21.725,20.325 21.725,16.245 21.3,15.82 21.3,15.33 21.725,14.905 21.725,13.845 21.995,13.575 22.183,13.575 22.5,13.258 22.5,12.27 22.745,12.025 23.005,12.025 23.43,11.6 23.775,11.6 24.2,11.175 26.725,11.175 27.625,10.275 27.625,8.575 28.45,7.75 29.155,7.75 29.813,7.093 29.813,5.643 29.125,4.955 29.125,4.645 29.285,4.485 29.285,3.336 30.788,1.833 31.675,1.833 v4(31.75,1.758) 31.75,1.518 v6(31.25,1.018)
  L11 w0.1: v5(31.25,0.617) v6(31.25,1.018)
  L12 w0.093: v5(31.25,0.617) J2.17@31.25,1.93
I2C4_SCL: J1.35 R45.1 R157.1 U1.E15 | length 154.3
  L1 w0.093: U1.E15@20.1,21.6 v2(20.5,21.2) ; v1(26.813,33.793) 27.412,33.793 27.7,33.505 R45.1@27.7,32.9 ; R157.1@36.7,2.7 v2@37.292,2.7
  L2 w0.1: v2(20.5,21.2) v3(20.8,21.5) ; v3(37.3,2.3) v2(37.3,2.7)
  L3 w0.08: v4(13.9,3.8) 14.775,2.925 15.725,2.925 16.2,3.4 17.325,3.4 17.8,2.925 18.225,2.925 18.559,3.259 19.676,3.259 20.117,3.7 21.983,3.7 22.69,2.993 24.93,2.993 25.312,3.375 26.1,3.375 26.375,3.1 29.283,3.1 29.583,2.8 33.783,2.8 34.041,2.541 34.5,2.541 35.341,1.7 36.4,1.7 37,2.3 v3(37.3,2.3) 37.9,1.7 60.73,1.7 62.715,3.685 62.715,6.815 63.8,7.9 v4(63.8,9.3) ; v2(20.5,21.2) v3(20.8,21.5) ; v1(26.813,33.793) 27.338,33.793 27.74,34.195 29.795,34.195 30.805,35.205 31.625,35.205 31.775,35.355 31.775,35.36 31.995,35.58 32.305,35.58 32.555,35.33 32.945,35.33 33.195,35.58 36.5,35.58 36.87,35.95 37.863,35.95 38.425,36.512 38.425,36.855 38.545,36.975 39,36.975 39.6,37.575 51.055,37.575 51.33,37.3 51.33,36.17 52.4,35.1 62.9,35.1 v4(64,34)
  L10 w0.08: v4(13.9,3.8) 13.9,4.63 13.725,4.805 13.725,7.567 14.1,7.942 14.1,8.5 15.625,10.025 15.625,11.255 15.725,11.355 15.725,14.775 15.525,14.975 15.525,16.155 15.745,16.375 15.975,16.375 16.3,16.7 16.3,18.4 16.075,18.625 16.075,19.505 16.675,20.105 16.675,20.705 17.07,21.1 18.47,21.1 18.745,20.825 20.125,20.825 v2(20.5,21.2) ; v4(63.8,9.3) 64.7,10.2 64.7,14.4 64.375,14.725 64.375,17.3 64.1,17.575 64.1,23.6 64.875,24.375 64.875,33.355 64.23,34 v4(64,34)
  L12 w0.093: J1.35@26.75,32.33 26.75,33.73 v1(26.813,33.793)
  other v4: 20.5,21.2
I2C4_SDA: J1.37 R44.1 R156.1 U1.D16 | length 158.7
  L1 w0.093: U1.D16@19.3,22.4 v2(19.7,22) ; v1(26.288,34.093) 26.363,34.168 27.832,34.168 28.3,33.7 28.3,31.9 28.1,31.7 R44.1@27.7,31.7 ; R156.1@36.687,1.408 v2@37.267,1.408
  L2 w0.1: v3(19.7,21.6) v2(19.7,22) ; v3(36.88,1.395) v2(37.28,1.395)
  L3 w0.08: v4(13.5,4.5) 13.5,3.67 14.445,2.725 15.908,2.725 16.333,3.15 17.192,3.15 17.617,2.725 18.408,2.725 18.692,3.009 19.809,3.009 20.25,3.45 21.83,3.45 22.487,2.793 25.013,2.793 25.395,3.175 25.9,3.175 26.275,2.8 29.2,2.8 29.5,2.5 32.3,2.5 32.4,2.6 33.7,2.6 34,2.3 34.3,2.3 35.205,1.395 v3(36.88,1.395) 60.908,1.395 63.1,3.587 63.1,6.7 64.3,7.9 v4(64.3,8.5) ; v4(19.7,21.2) v3(19.7,21.6) ; v1(26.288,34.093) 26.582,34.093 26.657,34.168 27.38,34.168 27.632,34.42 29.65,34.42 30.685,35.455 31.587,35.455 32.032,35.9 32.268,35.9 32.526,35.643 32.974,35.643 33.232,35.9 36.4,35.9 36.7,36.2 37.83,36.2 38.225,36.595 38.225,36.938 38.462,37.175 38.9,37.175 39.575,37.85 51.163,37.85 51.73,37.283 51.73,36.253 52.483,35.5 63.3,35.5 v4(64,34.8)
  L10 w0.08: v4@13.525,4.5 13.525,7.65 13.775,7.9 13.775,8.475 15.4,10.1 15.4,11.4 15.475,11.475 15.475,14.742 15.325,14.892 15.325,16.855 16.075,17.605 16.075,18.342 15.875,18.542 15.875,19.762 16.475,20.362 16.475,20.788 16.987,21.3 18.3,21.3 18.575,21.575 19.325,21.575 v4(19.7,21.2) ; v4(64,34.8) 64,34.73 65.275,33.455 65.275,24.292 64.5,23.517 64.5,17.658 64.775,17.383 64.775,14.808 65.1,14.483 65.1,9.3 v4(64.3,8.5)
  L12 w0.093: J1.37@26.25,32.33 26.25,34.055 v1(26.288,34.093)
JTAG_MOD: R61.2 U1.H6 | length 2.4
  L1 w0.3: v1(22.1,14) U1.H6@22.5,14.4
  L12 w0.3: R61.2@22,12.2 22.1,12.3 v1(22.1,14)
JTAG_NTRST: J2.41 R62.1 U1.C2 | length 16.2
  L1 w0.093: U1.C2@18.5,11.2 18.9,10.8 20.3,10.8 20.5,11 20.5,11.4 20.7,11.6 v2(21.3,11.6) ; v1(25.25,3.968) 25.3,3.918 R62.1@25.3,2.6
  L2 w0.1: v2(21.3,11.6) v3(21.6,11.3)
  L3 w0.08: v3(21.6,11.3) v4(22.1,10.8)
  L10 w0.08: v4(22.1,10.8) 22.1,10.179 22.725,9.554 22.725,8.767 25.238,6.255 25.238,3.981 v1(25.25,3.968)
  L12 w0.093: J2.41@25.25,1.93 v1(25.25,3.968)
JTAG_TCK: J2.43 R92.2 | length 3.9
  L1 w0.093: v1(24.75,3.368) 24.75,1.55 24.9,1.4 R92.2@25.3,1.4
  L12 w0.093: J2.43@24.75,1.93 v1(24.75,3.368)
JTAG_TCK_R: R92.1 U1.H5 | length 20.7
  L1 w0.093: v2(22.1,13.2) U1.H5@22.5,13.6 ; v2(25.8,2) 26.3,1.5 R92.1@26.3,1.4
  L2 w0.1: v3(21.8,13.5) v2(22.1,13.2) ; v2(25.8,2) v3(25.8,2.4)
  L3 w0.08: v3(21.8,13.5) 21.9,13.4 v4(21.9,13) ; v4(25.55,2.8) 25.55,2.65 v3(25.8,2.4)
  L10 w0.08: v4(21.9,13) 22,12.9 22,11.613 22.475,11.138 22.475,10.695 22.77,10.4 23.925,10.4 24.075,10.25 24.075,10 23.925,9.85 23.3,9.85 23.15,9.7 23.15,9.45 23.3,9.3 24.1,9.3 24.25,9.15 24.25,8.9 24.1,8.75 23.65,8.75 23.5,8.6 23.5,8.35 23.65,8.2 23.855,8.2 24.855,7.2 25.8,7.2 25.95,7.05 25.95,6.8 25.794,6.644 25.594,6.644 25.438,6.488 25.438,6.238 25.594,6.083 25.594,5.7 25.494,5.6 25.494,5.306 25.6,5.2 26,5.2 26.15,5.05 26.15,4.8 26,4.65 25.65,4.65 25.5,4.5 25.5,4.25 25.665,4.085 25.665,3.6 25.334,3.269 25.325,3.269 25.325,3.025 v4(25.55,2.8)
JTAG_TDI: J2.47 R90.2 | length 2.3
  L1 w0.093: v1(23.75,3.368) 23.75,2.75 R90.2@23.9,2.6
  L12 w0.093: J2.47@23.75,1.93 v1(23.75,3.368)
JTAG_TDI_R: R63.1 R90.1 U1.G5 | length 20.9
  L1 w0.093: v2(21.1,2) 21.6,1.5 R63.1@21.6,1.4 22,1.4 22.1,1.5 22.1,2.2 22.5,2.6 R90.1@22.9,2.6 ; v2(21.3,13.2) U1.G5@21.7,13.6
  L2 w0.1: v3(21,13.5) v2(21.3,13.2) ; v2(21.1,2) v3(21.1,2.4)
  L3 w0.08: v3(21,13.5) 21,13.1 v4(21.1,13) ; v3(21.1,2.4) v4(21.1,2.8)
  L10 w0.08: v4(21.1,2.8) 21.42,2.8 21.795,3.175 23.325,3.175 23.507,2.993 24.125,2.993 24.313,3.18 24.313,3.5 24.625,3.813 24.625,4.367 24.838,4.579 24.838,5.262 24.677,5.423 24.677,6.15 22.325,8.502 22.325,9.388 21.984,9.729 21.841,9.729 20.925,10.645 20.925,11.295 21.175,11.545 21.175,11.995 20.925,12.245 20.925,12.825 v4(21.1,13)
JTAG_TDO: J2.45 R161.2 | length 5.2
  L1 w0.093: R161.2@23.9,1.4 24.3,1.4 24.5,1.6 24.5,3.088 24.25,3.338 v1(24.25,3.968)
  L12 w0.093: J2.45@24.25,1.93 v1(24.25,3.968)
JTAG_TDO_R: R161.1 U1.G6 | length 19.4
  L1 w0.093: v2(21.3,14) U1.G6@21.7,14.4 ; v2(22.4,2) 22.9,1.5 R161.1@22.9,1.4
  L2 w0.1: v2(21.3,14) v3(21.6,14.3) ; v2(22.4,2) v3(22.4,2.4)
  L3 w0.08: v4(21.1,14) 21.4,14.3 v3(21.6,14.3) ; v4(21.95,2.8) 22,2.8 v3(22.4,2.4)
  L10 w0.08: v4(21.1,14) 21.1,13.755 21.525,13.33 21.525,12.705 21.675,12.555 21.675,10.321 22.525,9.471 22.525,8.635 24.95,6.21 24.95,5.433 25.038,5.345 25.038,4.496 24.875,4.334 24.875,3.773 25.125,3.523 25.125,3.205 24.712,2.793 v4@21.95,2.793
JTAG_TMS: J2.49 R64.1 U1.C3 | length 18.8
  L1 w0.093: U1.C3@18.5,12 18.9,11.6 20.3,11.6 20.5,11.8 v2(20.5,12.4) ; R64.1@21.6,2.6 22,2.6 22.3,2.9 22.3,3.6 22.668,3.968 v1(23.25,3.968)
  L2 w0.1: v3(20.5,12) v2(20.5,12.4)
  L3 w0.08: v3(20.5,12) v4(20.8,11.7)
  L10 w0.08: v4(20.8,11.7) 20.725,11.625 20.725,10.462 21.658,9.529 21.859,9.529 22.125,9.263 22.125,8.369 24.394,6.1 24.394,5.306 24.638,5.062 24.638,4.662 24.405,4.43 23.712,4.43 v1(23.25,3.968)
  L12 w0.093: J2.49@23.25,1.93 v1(23.25,3.968)
LED1: R82.1 R94.1 U8.17 | length 10.5
  L1 w0.093: U8.17@13.25,38.49 v2(13.25,39.1) ; v2(19.975,39.08) 19.975,39.05 R94.1@20.525,38.5 R82.1@21.5,38.5
  L2 w0.1: v3(13.25,38.7) v2(13.25,39.1) ; v3(19.975,38.68) v2(19.975,39.08)
  L3 w0.08: v3(13.25,38.7) 13.535,38.415 14.368,38.415 14.503,38.55 17.15,38.55 17.4,38.8 18.287,38.8 18.662,38.425 19.138,38.425 19.413,38.7 v3@19.975,38.7
LED2: R81.1 R102.2 U8.15 | length 14.2
  L1 w0.093: U8.15@14.25,38.49 v2(14.25,39.1) ; R102.2@25.2,37.3 R81.1@25.2,38.5 v2(25.2,39.1)
  L2 w0.1: v3(14.25,38.7) v2(14.25,39.1) ; v3(24.8,39.1) v2(25.2,39.1)
  L3 w0.08: v3(14.25,38.7) 14.35,38.8 17.1,38.8 17.3,39 18.37,39 18.745,38.625 19.055,38.625 19.415,38.985 24.685,38.985 v3(24.8,39.1)
LGATE1_2V5: Q6.4 U13.18 | length 16.2
  L1 w0.5: v1(62.1,30.4) 62.995,30.4 Q6.4@63,30.395
  L3 w0.5: 68.7,22 v1(68.9,21.8)
  L3 w0.6: 62.1,30.1 v1(62.1,30.4) ; 64.3,23.2 65.2,22.3 68.4,22.3 68.7,22
  L3 w0.8: 62.1,30.1 62.1,25.4 64.3,23.2
  L12 w0.2: U13.18@67.1,21.25 68.05,21.25 68.2,21.4
  L12 w0.3: 68.2,21.4 68.3,21.5
  L12 w0.4: 68.3,21.5 68.6,21.8 v1(68.9,21.8)
LGATE1_3V3: Q3.4 U11.18 | length 18.2
  L1 w0.5: v1(6.1,9.6) 6.995,9.6 Q3.4@7,9.605
  L3 w0.6: v1(1.6,19) 2,18.6 ; 5.8,9.3 v1(6.1,9.6)
  L3 w0.8: 2,18.6 2.6,18 4.4,18 5.4,17 5.4,15.5 3.4,13.5 3.4,9.9 4.3,9 5.5,9 5.8,9.3
  L12 w0.2: v1(1.6,19) 2.1,19 2.35,18.75 U11.18@2.9,18.75
LGATE2_1V5: Q7.4 U13.23 | length 11
  L1 w0.5: v1(67.7,9.6) 68.595,9.6 Q7.4@68.6,9.605
  L3 w0.5: 67.7,18.4 67.7,18.6 v1(67.9,18.8)
  L3 w0.6: v1(67.7,9.6) 67.7,9.9
  L3 w0.8: 67.7,9.9 67.7,18.4
  L12 w0.2: U13.23@67.1,18.75 67.85,18.75 v1(67.9,18.8)
LGATE2_1V375: Q4.4 U11.23 | length 11.2
  L1 w0.5: Q4.4@1.4,30.395 v1@2.295,30.395
  L3 w0.6: 1.9,21.7 v1(2.2,21.4) ; 2.3,30 v1(2.3,30.4)
  L3 w0.8: 1.9,21.7 1.575,22.025 1.575,27.975 2.3,28.7 2.3,30
  L12 w0.2: v1(2.2,21.4) 2.35,21.25 U11.23@2.9,21.25
LVDS0_CABC: J2.6 R33.1 U1.A17 | length 46.6
  L1 w0.093: U1.A17@16.9,23.2 v2(17.3,22.8) ; v1(34.25,5.68) 34.82,5.68 35,5.5 R33.1@35,5.1
  L2 w0.1: v3(17,22.5) v2(17.3,22.8)
  L3 w0.08: v4(12.9,7.1) 12.9,7.3 13.65,8.05 14.633,8.05 15.517,7.166 15.517,6.408 15.8,6.125 16.875,6.125 17.55,5.45 17.892,5.45 18.167,5.725 18.925,5.725 19.2,6 20.2,6 20.4,5.8 21.083,5.8 21.183,5.7 22.219,5.7 22.489,5.43 25.596,5.43 25.853,5.173 26.105,5.173 26.344,5.412 26.825,5.412 27.12,5.118 28.954,5.118 29.212,5.375 29.833,5.375 30.158,5.05 30.687,5.05 31.012,5.375 31.65,5.375 31.9,5.125 33.282,5.125 33.838,5.68 v1(34.25,5.68) ; v3(17,22.5) v4(17.3,22.2)
  L10 w0.08: v4(12.9,7.1) 12.9,7.67 13.275,8.045 13.275,8.975 14.7,10.4 14.7,17.07 15.119,17.489 15.119,18.132 15.3,18.313 15.3,20.53 15.87,21.1 16.221,21.1 17.3,22.179 v4(17.3,22.2)
  L12 w0.093: v1(34.25,5.68) J2.6@34.25,7.67
LVDS0_CLK_N: J2.13 U1.V4 | length 17.5
  L1 w0.09: U1.V4@30.5,12.8 v2(30.9,12.4)
  L2 w0.1: v3(30.6,12.7) v2(30.9,12.4)
  L3 w0.085: v4(30.3,12.4) v3(30.6,12.7)
  L10 w0.085: v4(30.3,12.4) 29.62,11.72 29.62,10.42 29.4,10.2 28.804,10.2 28.368,9.763 28.368,9.032 28.868,8.532 30.168,8.532 30.6,8.1 30.6,4.956 30,4.356 30,3.6 30.708,2.892 32,2.892 v6(32.05,2.843)
  L11 w0.1: v6(32.05,2.843) 32.05,3.043 v5(32.25,3.243)
  L12 w0.09: J2.13@32.25,1.93 v5(32.25,3.243)
LVDS0_CLK_P: J2.15 U1.V3 | length 17.5
  L1 w0.09: U1.V3@30.5,12 v2(30.9,11.6)
  L2 w0.1: v3(30.6,11.9) v2(30.9,11.6)
  L3 w0.085: v3(30.6,11.9) v4(30.9,12.2)
  L10 w0.085: v4(30.9,12.2) 30.754,12.2 30.492,11.938 30.233,11.938 29.9,11.604 29.9,10.304 29.516,9.92 28.92,9.92 28.648,9.648 28.648,9.148 28.983,8.812 30.283,8.812 30.88,8.216 30.88,4.84 30.28,4.24 30.28,3.716 30.823,3.172 31.85,3.172 31.95,3.273 v6(31.95,3.643)
  L11 w0.1: v5(31.75,3.243) 31.95,3.443 v6(31.95,3.643)
  L12 w0.09: J2.15@31.75,1.93 v5(31.75,3.243)
LVDS0_PWM: J2.5 U1.F18 | length 52.6
  L1 w0.093: v2(20.5,23.6) U1.F18@20.9,24
  L2 w0.1: v3(20.1,23.3) 20.4,23.6 v2(20.5,23.6)
  L3 w0.08: v4(13.1,6.3) 13.275,6.475 13.275,7.175 13.9,7.8 14.55,7.8 15.317,7.033 15.317,6.225 15.617,5.925 16.742,5.925 17.467,5.2 17.975,5.2 18.3,5.525 19.008,5.525 19.283,5.8 20.117,5.8 20.317,5.6 21,5.6 21.2,5.4 22.136,5.4 22.356,5.18 25.467,5.18 25.747,4.9 26.115,4.9 26.395,5.18 26.724,5.18 27.037,4.868 29.037,4.868 29.345,5.175 29.7,5.175 30.075,4.8 30.77,4.8 31.145,5.175 31.505,5.175 31.805,4.875 32.938,4.875 33.383,4.43 34.225,4.43 v1(34.25,4.455) ; v3(20.1,23.3) 20.1,23.1 v4(20.4,22.8)
  L10 w0.08: v4(13.1,6.3) 13.275,6.475 13.275,7.762 13.475,7.962 13.475,8.892 14.9,10.317 14.9,16.987 15.319,17.406 15.319,18.049 15.5,18.23 15.5,20 15.7,20.2 16.03,20.2 16.275,20.445 16.275,20.871 17.004,21.6 18.23,21.6 18.525,21.895 18.525,22.155 18.745,22.375 19.1,22.375 19.85,21.625 20.655,21.625 20.9,21.87 20.9,22.3 v4(20.4,22.8)
  L12 w0.093: J2.5@34.25,1.93 v1(34.25,4.455)
LVDS0_TX0_N: J2.2 U1.U2 | length 17.4
  L1 w0.09: v2(29.3,11.6) U1.U2@29.7,11.2
  L2 w0.1: v3(29,11.3) v2(29.3,11.6)
  L3 w0.085: v4(28.6,10.9) v3(29,11.3)
  L10 w0.085: v4(28.6,10.9) 28.783,11.082 28.783,11.363 28.868,11.448 28.868,11.752 28.52,12.1 28.52,13.036 29.117,13.632 29.452,13.632 30.492,14.672 31.944,14.672 33.28,13.336 33.28,13.02 33.733,12.568 33.733,11.383 35.048,10.068 35.048,8.911 34.85,8.713 v6(34.85,8.582)
  L11 w0.1: v6(34.85,8.582) v5(35.25,8.982)
  L12 w0.09: J2.2@35.25,7.67 v5(35.25,8.982)
LVDS0_TX0_P: J2.4 U1.U1 | length 17.4
  L1 w0.09: v2(29.3,10.8) U1.U1@29.7,10.4
  L2 w0.1: v2(29.3,10.8) v3(29.6,11.1)
  L3 w0.085: v4(29.2,10.7) v3(29.6,11.1)
  L10 w0.085: v4(29.2,10.7) 29.063,10.837 29.063,11.247 29.148,11.332 29.148,11.868 28.8,12.216 28.8,12.92 29.233,13.352 29.568,13.352 30.608,14.392 31.828,14.392 32.12,14.1 32.12,13.9 31.96,13.74 31.96,13.6 32.07,13.49 32.21,13.49 32.37,13.65 32.57,13.65 33,13.22 33,12.904 33.453,12.452 33.453,11.267 34.768,9.952 34.768,9.027 34.35,8.609 v6(34.35,8.582)
  L11 w0.1: v6(34.35,8.582) v5(34.75,8.982)
  L12 w0.09: J2.4@34.75,7.67 v5(34.75,8.982)
LVDS0_TX1_N: J2.8 U1.U4 | length 17.4
  L1 w0.09: U1.U4@29.7,12.8 v2(30.1,13.2)
  L2 w0.1: v3(29.8,12.9) v2(30.1,13.2)
  L3 w0.085: v4(29.3,12.9) 29.4,12.8 29.7,12.8 v3(29.8,12.9)
  L10 w0.085: v4(29.3,12.9) 29.303,12.903 29.687,12.903 29.964,13.18 31.368,13.18 32.932,11.616 32.932,11.068 33.548,10.452 33.548,9.368 33.9,9.016 33.9,8.38 34.242,8.038 35.162,8.038 35.7,7.5 35.7,6.254 35.296,5.85 34.684,5.85 34.28,6.254 34.28,6.52 34.042,6.758 v6(33.75,6.758)
  L11 w0.1: v5(33.75,6.358) v6(33.75,6.758)
  L12 w0.09: v5(33.75,6.358) J2.8@33.75,7.67
LVDS0_TX1_P: J2.10 U1.U3 | length 17.4
  L1 w0.09: U1.U3@29.7,12 v2(30.1,12.4)
  L2 w0.1: v3(29.8,12.1) v2(30.1,12.4)
  L3 w0.085: v4(29.3,12.3) 29.6,12.3 v3(29.8,12.1)
  L10 w0.085: v4(29.3,12.3) 29.354,12.3 29.677,12.623 29.803,12.623 30.08,12.9 31.252,12.9 32.652,11.5 32.652,10.952 33.268,10.337 33.268,9.252 33.62,8.9 33.62,8.264 34.126,7.758 35.046,7.758 35.42,7.384 35.42,6.37 35.18,6.13 34.8,6.13 34.56,6.37 34.56,6.636 34.158,7.038 33.997,7.038 33.904,7.13 33.43,7.13 33.25,6.95 v6(33.25,6.758)
  L11 w0.1: v5(33.25,6.358) v6(33.25,6.758)
  L12 w0.09: v5(33.25,6.358) J2.10@33.25,7.67
LVDS0_TX2_N: J2.1 U1.V2 | length 17.4
  L1 w0.09: U1.V2@30.5,11.2 v2(30.9,10.8)
  L2 w0.1: v3(30.6,11.1) v2(30.9,10.8)
  L3 w0.085: v4(30.3,10.8) v3(30.6,11.1)
  L10 w0.085: v4(30.3,10.8) 30.892,10.8 31.276,10.416 31.276,9.878 31.398,9.757 31.398,8.898 31.945,8.351 31.945,6.071 32.3,5.716 32.3,5.152 31.948,4.8 31.948,4.6 32.508,4.04 32.508,3.841 32.815,3.533 32.815,2.781 33.131,2.465 35.435,2.465 35.8,2.1 35.8,1.567 v6(35.25,1.017)
  L11 w0.1: v5(35.25,0.617) v6(35.25,1.017)
  L12 w0.09: v5(35.25,0.617) J2.1@35.25,1.93
LVDS0_TX2_P: J2.3 U1.V1 | length 17.4
  L1 w0.09: U1.V1@30.5,10.4 v2(30.9,10)
  L2 w0.1: v3(30.6,10.3) v2(30.9,10)
  L3 w0.085: v4(30.3,10) v3(30.6,10.3)
  L10 w0.085: v4(30.3,10) 30.3,10.146 30.674,10.52 30.776,10.52 30.996,10.3 30.996,9.762 31.118,9.641 31.118,8.782 31.665,8.235 31.665,5.955 32.02,5.6 32.02,5.268 31.668,4.916 31.668,4.484 32.228,3.924 32.228,3.725 32.535,3.418 32.535,2.665 33.015,2.185 35.319,2.185 35.52,1.984 35.52,1.683 35.227,1.39 35.096,1.39 34.75,1.044 v6(34.75,1.017)
  L11 w0.1: v5(34.75,0.617) v6(34.75,1.017)
  L12 w0.09: v5(34.75,0.617) J2.3@34.75,1.93
LVDS0_TX3_N: J2.7 U1.W2 | length 17.4
  L1 w0.09: U1.W2@31.3,11.2 v4(31.7,10.8)
  L2 w0.1: v3(31.4,11.1) v4(31.7,10.8)
  L3 w0.085: v3(31.4,11.1) v4(31.7,10.8)
  L10 w0.085: v4(31.7,10.8) 31.882,10.618 32.178,10.618 32.532,10.263 32.532,9.168 32.968,8.733 32.968,6.443 34.098,5.312 34.483,5.312 34.9,4.896 35.449,4.896 35.913,4.432 36.568,4.432 36.98,4.02 36.98,3.484 36.516,3.02 35.68,3.02 35.057,3.643 v6(33.75,3.643)
  L11 w0.1: v5(33.75,3.243) v6(33.75,3.643)
  L12 w0.09: J2.7@33.75,1.93 v5(33.75,3.243)
  other v2: 31.7,10.8
LVDS0_TX3_P: J2.9 U1.W1 | length 17.4
  L1 w0.09: U1.W1@31.3,10.4 v4(31.7,10)
  L2 w0.1: v3(31.4,10.3) v4(31.7,10)
  L3 w0.085: v3(31.4,10.3) v4(31.7,10)
  L10 w0.085: v4(31.7,10) 31.7,10.237 31.8,10.338 32.062,10.338 32.252,10.148 32.252,9.053 32.688,8.617 32.688,6.327 33.982,5.032 34.368,5.032 34.784,4.616 35.333,4.616 35.797,4.152 36.452,4.152 36.7,3.904 36.7,3.6 36.4,3.3 35.796,3.3 35.173,3.923 33.997,3.923 33.904,4.015 33.596,4.015 33.25,3.669 v6(33.25,3.643)
  L11 w0.1: v5(33.25,3.243) v6(33.25,3.643)
  L12 w0.09: J2.9@33.25,1.93 v5(33.25,3.243)
  other v2: 31.7,10
NetC88_1: C88.1 U6.4 | length 2.1
  L12 w0.4: C88.1@61.4,7.8 62.4,7.8 62.75,8.15 U6.4@62.75,8.75
NetC211_2: C211.2 R122.1 | length 1
  L12 w0.4: C211.2@1.4,16.4 1.4,17.3 R122.1@1.5,17.4
NetC212_1: C212.1 R121.2 | length 1.1
  L12 w0.4: C212.1@1.3,23.8 1.3,22.8 R121.2@1.4,22.7
NetC230_2: C230.2 R145.1 | length 1.1
  L12 w0.4: R145.1@68.4,23.5 68.5,23.6 C230.2@68.5,24.6
NetC231_1: C231.1 R146.2 | length 1.2
  L12 w0.4: R146.2@68.6,17.3 68.7,17.2 C231.1@68.7,16.1
NetD2_1: D2.1 Q1.3 | length 2
  L1 w0.093: D2.1@8.7,1.3 v1(9.6,1.3)
  L12 w0.093: Q1.3@9.45,2.3 9.6,2.15 v1(9.6,1.3)
NetD2_2: D2.2 R113.1 | length 2.9
  L1 w0.093: D2.2@8.7,2.9 9.4,2.9 v1(9.6,3.1)
  L12 w0.093: R113.1@8.5,4.4 8.5,3.9 9,3.4 9.3,3.4 v1(9.6,3.1)
NetD3_1: D3.1 Q2.3 | length 2.8
  L1 w0.093: D3.1@27.7,2.7 28.3,2.7 28.5,2.5 28.5,2.1 28.75,1.85 Q2.3@29.9,1.85
NetD3_2: D3.2 R114.1 | length 4.5
  L1 w0.093: D3.2@27.7,1.1 30.983,1.1 31.283,1.4 R114.1@32.1,1.4
NetQ5_1: Q5.1 Q8.3 R131.1 | length 5
  L12 w0.093: Q5.1@1.75,13.95 2.55,13.95 3.65,12.85 Q8.3@3.65,11.9 4.4,11.9 4.8,12.3 R131.1@4.8,12.7
NetR106_1: R106.1 U12.8 | length 1.4
  L1 w0.093: v1(10.8,4.9) 10.9,5 U12.8@10.9,5.45
  L12 w0.093: v1(10.8,4.9) 10.9,4.8 R106.1@10.9,4.2 R106.1@10.9,4.1
NetR109_2: R109.2 U10.7 | length 3
  L1 w0.093: U10.7@28.05,7.035 28.645,7.035 29.063,6.618 30.218,6.618 30.4,6.8 R109.2@30.4,7.2
NetR110_1: R110.1 U10.3 | length 2.5
  L1 w0.093: R110.1@21.3,7.4 21.3,7 21.813,6.487 21.813,5.987 22.035,5.765 U10.3@22.55,5.765
NetR121_1: R121.1 U11.24 | length 1.6
  L12 w0.2: R121.1@1.4,21.7 1.8,21.7 2,21.9 2.301,21.9 2.451,21.75 U11.24@2.9,21.75
NetR122_2: R122.2 U11.17 | length 2.1
  L12 w0.2: U11.17@2.9,18.25 2.275,18.25 2.125,18.4 ; 2.125,18.4 R122.2@1.5,18.4 2.125,18.4
NetR124_1: R124.1 U11.31 | length 1.5
  L12 w0.2: R124.1@6.2,23.8 6.55,23.45 U11.31@6.55,22.4
NetR125_2: R125.2 U11.12 | length 1.9
  L12 w0.2: R125.2@4.9,16 4.9,16.3 5.55,16.95 U11.12@5.55,17.6
NetR128_1: R128.1 R133.2 U11.2 | length 7.5
  L10 w0.08: v6(8.5,21.575) 8.5,21.9 8.9,22.3 v6(8.9,24.6)
  L11 w0.1: v5(8.2,21.275) v6(8.5,21.575) ; v6(8.9,24.6) v5(8.9,25)
  L12 w0.093: U11.2@7.7,21.25 v5@8.25,21.25 ; v5(8.9,25) R133.2@9.4,25 10,25.6 10.8,25.6 10.9,25.5 R128.1@11.5,25.5
NetR145_2: R145.2 U13.17 | length 1.6
  L12 w0.2: U13.17@67.1,21.75 67.65,21.75 R145.2@68.4,22.5
NetR146_1: R146.1 U13.24 | length 1.5
  L12 w0.2: U13.24@67.1,18.25 68.55,18.25 R146.1@68.6,18.3
NetR148_1: R148.1 U13.31 | length 1.6
  L12 w0.2: U13.31@63.45,17.6 63.45,16.05 R148.1@63.5,16
NetR149_2: R149.2 U13.12 | length 1.7
  L12 w0.2: U13.12@64.45,22.4 64.45,23.45 R149.2@64.9,23.9
NetR152_1: R152.1 R155.2 U13.2 | length 6.5
  L12 w0.093: R152.1@57.9,15.9 58.5,15.9 58.6,16 R155.2@59,16 59,17.5 59.4,17.9 61,17.9 61.85,18.75 U13.2@62.3,18.75
ON_5V_LDO: R127.1 U11.4 | length 5.6
  L12 w0.093: U11.4@7.7,20.25 8.45,20.25 9.7,21.5 11.5,21.5 11.8,21.8 12,21.8 12.2,22 R127.1@12.2,22.4
ON_5V_LDO_2: R151.1 U13.4 | length 4.2
  L12 w0.093: R151.1@58.2,19.6 58.9,19.6 59,19.5 61.35,19.5 61.6,19.75 U13.4@62.3,19.75
ON_OFF: J1.6 R48.1 U1.D12 | length 84.9
  L1 w0.093: U1.D12@19.3,19.2 v2(19.7,19.6)
  L2 w0.1: v2(19.7,19.6) v3(20,19.9)
  L3 w0.08: v1(4.8,10.6) 5.5,11.3 5.5,13.87 7.7,16.07 8,16.07 9.255,17.325 10.7,17.325 11,17.625 11,18.33 11.345,18.675 12.326,18.675 13.151,19.5 15.634,19.5 15.934,19.8 18.287,19.8 18.662,20.175 19.725,20.175 v3(20,19.9) ; v4(15.5,37.1) 15.7,37.1 16.422,36.378 17.022,36.378 17.175,36.225 17.175,36.095 17.445,35.825 17.755,35.825 17.93,36 19.6,36 19.955,36.355 21.782,36.355 22.032,36.105 23.005,36.105 23.496,36.596 23.85,36.596 24.349,37.095 25.581,37.095 25.841,37.355 28.555,37.355 29.585,38.385 30.418,38.385 30.585,38.218 30.585,38.215 30.7,38.1 34.092,38.1 v4(34.25,37.943)
  L10 w0.08: v1(4.8,10.6) 4.8,11.2 4.4,11.6 4.4,12.5 3.825,13.075 3.825,18.695 4.275,19.145 4.275,19.55 4,19.825 4,21.7 4.75,22.45 4.75,23.468 4.38,23.838 4.38,24.3 3,25.68 3,29.4 3.725,30.125 3.725,31.325 4.6,32.2 4.6,33.371 7.329,36.1 7.63,36.1 8.83,37.3 9.083,37.3 9.758,37.975 14.625,37.975 v4(15.5,37.1) ; v4(34.25,37.943) v6(34.25,38.982)
  L11 w0.1: v6(34.25,38.982) v5(34.25,39.383)
  L12 w0.093: v1(4.8,10.6) R48.1@5.4,10 ; J1.6@34.25,38.07 v5(34.25,39.383)